# Altium PCB PY32E407Vx_START_ETH.PcbDoc (part 4 of 4)
Units mil, origin at the board's own origin, x right, y up, seen from the top; angles counter-clockwise.
Board outline 5249.65 x 2929.38 mil, 4 copper layers (Top Layer, GND, POWER, Bottom Layer); 253 components, 243 nets, 969 pads, 637 vias.
Unrouted connection lines stored in the file: 88.
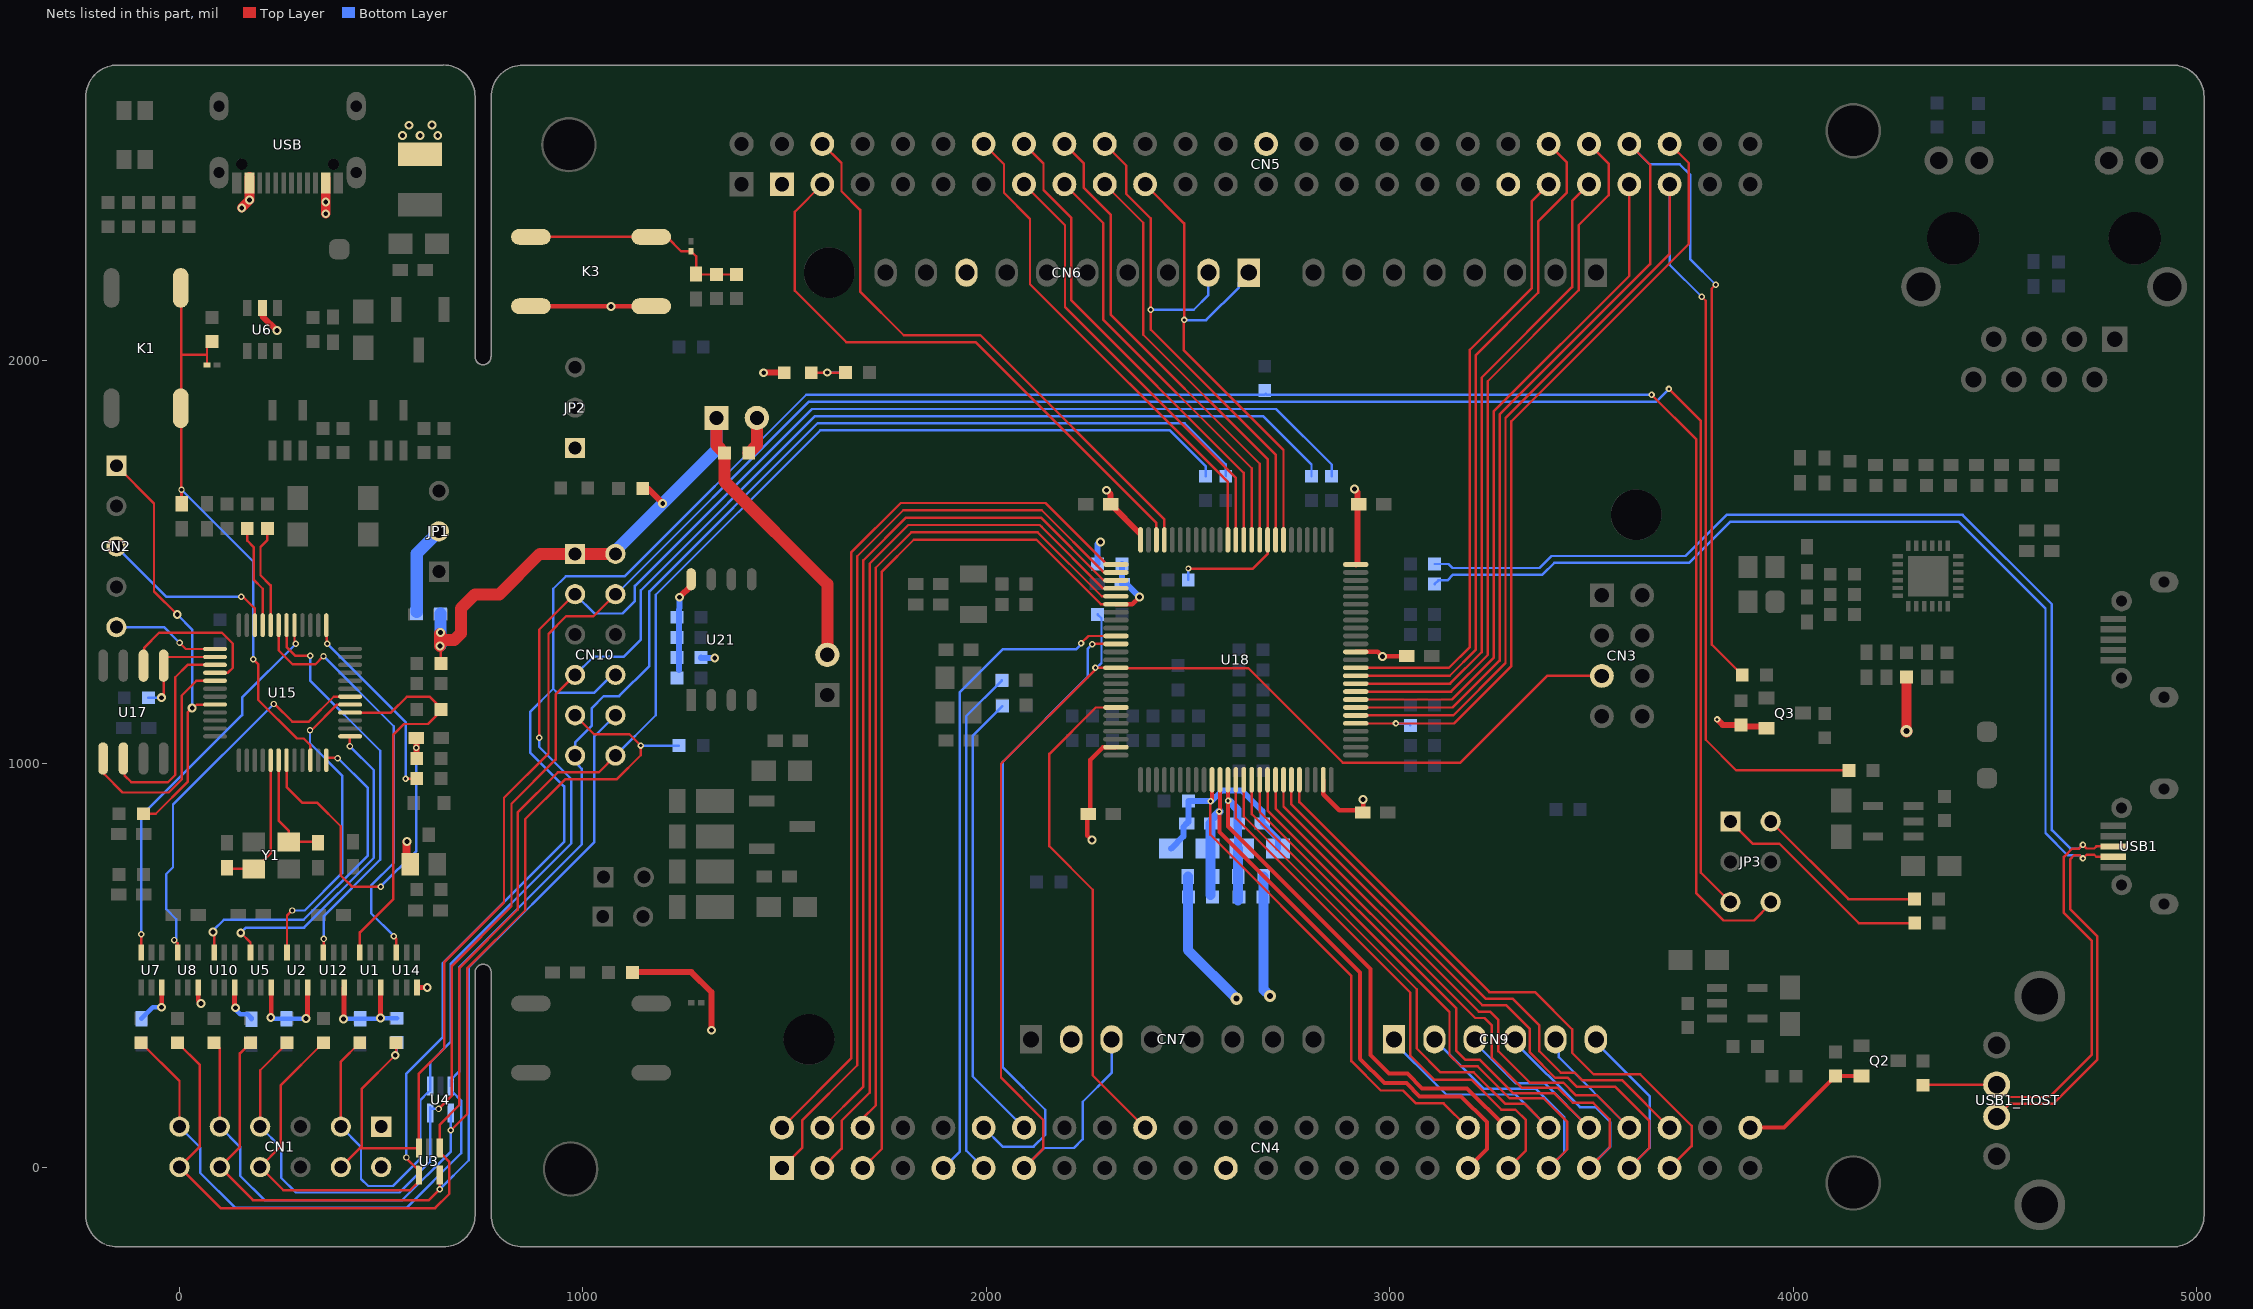
[diagram p5: the nets of this part, all layers, seen from the top]

## Via types
v1: diameter 22, hole 12, Top Layer to Bottom Layer, tented both sides, 393 vias
v2: diameter 16, hole 8, Top Layer to Bottom Layer, tented both sides, 115 vias
v3: diameter 20, hole 10, Top Layer to Bottom Layer, tented both sides, 54 vias
v4: diameter 16, hole 9, Top Layer to Bottom Layer, tented both sides, 41 vias
v5: diameter 30, hole 15, Top Layer to Bottom Layer, tented both sides, 16 vias
v6: diameter 20, hole 10, Top Layer to Bottom Layer, 9 vias
v7: diameter 15, hole 8, Top Layer to Bottom Layer, tented both sides, 5 vias
v8: diameter 16, hole 8, Top Layer to Bottom Layer, 3 vias
v9: diameter 20, hole 12, Top Layer to Bottom Layer, tented both sides, 1 vias

## Nets (pads, with @x,y where several pads share a name; then routed paths per layer and width w, separated by ;. In a path a pad name is that pad's centre, name@x,y a point inside that pad or via, vN(x,y) a via of type N, cw(c..) or ccw(c..) an arc to the next point about the centre after c; other vN are vias at no path point) (continued)
PD0: CN5.19 CN6.1 U18.82 | length 1240.6
  Top Layer w6: CN5.19@2393.11,2435.55 2489.9,2338.75 v2(2489.9,2099.31) 2488.41,2097.83 2488.41,2024.68 2736.11,1776.98 U18.82@2736.11,1554.33
  Bottom Layer w6: v2(2489.9,2099.31) 2490.31,2098.9 2544.4,2098.9 2625.61,2180.1 2625.61,2192.05 CN6.1@2650.11,2216.55
PD1: CN5.18 CN6.2 U18.83 | length 1370.1
  Top Layer w6: CN5.18@2293.11,2535.55 2346.5,2482.15 2346.5,2411.59 2407.16,2350.93 v2(2407.16,2124.56) 2407.1,2124.5 2407.1,2075.3 2716.43,1765.97 U18.83@2716.43,1554.33
  Bottom Layer w6: v2(2407.16,2124.56) 2513.57,2124.56 2550.11,2161.1 CN6.2@2550.11,2216.55
PD2: CN5.17 R50.2 U18.84 | length 1323.1
  Top Layer w6: CN5.17@2293.11,2435.55 2388.5,2340.15 2388.5,2062.59 2696.74,1754.35 2696.74,1519.51 2660.39,1483.16 v7(2500.17,1483.16)
  Bottom Layer w6: R50.2@2500,1455 2500.17,1455.17 v7(2500.17,1483.16)
PD3: CN5.16 U18.85 | length 1181.7
  Top Layer w6: CN5.16@2193.11,2535.55 2241.4,2487.25 2241.4,2426.49 2308.2,2359.69 2308.2,2111.89 2677.06,1743.03 U18.85@2677.06,1554.33
PD4: CN5.15 U18.86 | length 1073.5
  Top Layer w6: CN5.15@2193.11,2435.55 2289.6,2339.05 2289.6,2099.49 2657.37,1731.72 U18.86@2657.37,1554.33
PD5: CN5.14 U18.87 | length 1206.8
  Top Layer w6: CN5.14@2093.11,2535.55 2141.3,2487.35 2141.3,2421.59 2210.5,2352.39 2210.5,2147.59 2637.69,1720.4 U18.87@2637.69,1554.33
PD6: CN5.13 U18.88 | length 1098.6
  Top Layer w6: CN5.13@2093.11,2435.55 2194.5,2334.15 2194.5,2131.59 2618,1708.09 U18.88@2618,1554.33
PD7: CN5.12 U18.89 | length 1232.7
  Top Layer w6: CN5.12@1993.11,2535.55 2043.37,2485.28 2043.37,2414.47 2107.9,2349.94 2107.9,2187.81 2598.32,1697.39 U18.89@2598.32,1554.33 U18.89@2597.74,1553.76
PD8: CN5.46 R58.2 U18.55 | length 1977.9
  Top Layer w6: U18.55@2915.24,1099.61 2915.58,1099.28 3014.72,1099.28 v2(3014.83,1099.38) 3014.93,1099.28 3158.28,1099.28 3301,1241.99 3301,1848.33 3740.4,2287.73 3740.4,2488.25 CN5.46@3693.11,2535.55
  Bottom Layer w6: v2(3014.83,1099.38) 3015.62,1098.59 3046.5,1098.59 R58.2@3050.5,1094.59
PD9: CN5.45 R91.1 U18.56 | length 3580
  Top Layer w6: U18.56@2915.24,1119.29 3156.8,1119.29 3286.29,1248.78 3286.29,1856.09 3693.11,2262.91 CN5.45@3693.11,2435.55 ; v2(3772.51,2156.77) 3782.48,2146.8 3782.48,1058.89 3858.24,983.13 R91.1@4137.5,983.13
  Bottom Layer w6: CN5.45@3693.11,2435.55 3693.11,2236.17 v2(3772.51,2156.77)
PD10: CN5.44 R117.2 U18.57 | length 3344.7
  Top Layer w6: U18.57@2915.24,1138.98 3155.29,1138.98 3271.57,1255.27 3271.57,1864.73 3644.7,2237.86 3644.7,2483.95 CN5.44@3593.11,2535.55 ; v2(3807.19,2186.76) 3797.42,2176.99 3797.42,1294.82 R117.2@3872.98,1219.26
  Bottom Layer w6: CN5.44@3593.11,2535.55 3643.66,2484.99 3718.26,2484.99 3744.56,2458.69 3744.56,2249.39 v2(3807.19,2186.76)
PD11: CN5.43 U18.58 | length 1721.6
  Top Layer w6: U18.58@2915.24,1158.66 3153.67,1158.66 3256.86,1261.85 3256.86,1872.32 3593.11,2208.57 CN5.43@3593.11,2435.55
  Bottom Layer w6: CN5.43@3593.11,2435.55 3601.15,2435.55 CN5.43@3601.15,2419.35
PD12: CN5.42 U18.59 | length 1775.2
  Top Layer w6: U18.59@2915.24,1178.35 3151.56,1178.35 3242.14,1268.94 3242.14,1947.44 3467.9,2173.19 3467.9,2334.67 3541.7,2408.47 3541.7,2486.95 CN5.42@3493.11,2535.55
PD13: CN5.41 U18.60 | length 1613.9
  Top Layer w6: U18.60@2915.24,1198.03 3149.14,1198.03 3227.43,1276.32 3227.43,1956.62 3451.5,2180.69 3451.5,2393.94 CN5.41@3493.11,2435.55
PD14: CN5.40 U18.61 | length 1689.1
  Top Layer w6: U18.61@2915.24,1217.72 3147.93,1217.72 3212.71,1282.51 3212.71,2012.16 ; 3212.77,2012.16 3367.22,2166.62 3367.22,2343.8 3437.8,2414.37 3437.8,2490.85 CN5.40@3393.11,2535.55
PD15: CN5.39 U18.62 | length 1531.4
  Top Layer w6: U18.62@2915.24,1237.4 3146.31,1237.4 3198,1289.09 3198,2025.49 3351.5,2178.99 3351.5,2393.94 CN5.39@3393.11,2435.55
PE0: CN5.4 U18.97 | length 1443.5
  Top Layer w6: CN5.4@1593.11,2535.55 1640.59,2488.07 1640.59,2418.41 1686.8,2372.2 1686.8,2169.49 1794.99,2061.3 1984.79,2061.3 2440.83,1605.26 U18.97@2440.83,1554.33
PE1: CN5.3 U18.98 | length 1468.2
  Top Layer w6: CN5.3@1593.11,2435.55 1525,2367.44 1525,2171.89 1652.6,2044.29 1972.8,2044.29 2421.15,1595.94 U18.98@2421.15,1554.33
PE2: CN4.2 U18.1 | length 2266.5
  Top Layer w6: CN4.2@1493.11,97.55 1664.52,268.96 1664.52,1522.61 1787.68,1645.77 2146.58,1645.77 2299.04,1493.31 U18.1@2320.76,1493.31
PE3: CN4.1 U18.2 | length 2345.4
  Top Layer w6: CN4.1@1493.11,-2.45 1543,47.44 1543,115.59 1679.79,252.38 1679.79,1513.68 1793.68,1627.58 2136.94,1627.58 2290.88,1473.63 U18.2@2320.76,1473.63
PE4: CN4.4 U18.3 | length 2182.4
  Top Layer w6: CN4.4@1593.11,97.55 1695.05,199.49 1695.05,1503.98 1800.45,1609.38 2135,1609.38 2290.44,1453.94 U18.3@2320.76,1453.94
PE5: CN4.3 U18.4 | length 2261.5
  Top Layer w6: CN4.3@1593.11,-2.45 1641.1,45.54 1641.1,114.85 1710.32,184.07 1710.32,1495.3 1806.2,1591.18 2132.13,1591.18 2136.59,1586.72 2289.05,1434.26 U18.4@2320.76,1434.26
PE6: CN4.6 U18.5 | length 2098.2
  Top Layer w6: CN4.6@1693.11,97.55 1693.11,120.4 1725.59,152.88 1725.59,1485.09 1813.49,1572.99 2127.1,1572.99 2285.52,1414.57 U18.5@2320.76,1414.57
PE7: CN4.37 U18.38 | length 1352.4
  Top Layer w6: U18.38@2618,959.85 2618,914.55 2618,864.29 3050.5,431.79 3050.5,275.86 3109.75,216.61 3201.69,216.61 3276.2,142.09 3311,142.09 3336.8,116.29 3336.8,41.24 CN4.37@3293.11,-2.45
PE8: CN4.40 CN9.1 U18.39 | length 1729.7
  Top Layer w6: U18.39@2637.69,959.85 2637.69,869.22 3066.2,440.71 3066.2,294.09 3125.58,234.71 3207.48,234.71 3285.1,157.09 3333.56,157.09 CN4.40@3393.11,97.55
  Bottom Layer w6: CN9.1@3010.11,316.55 3010.11,309.05 3116.3,202.85 3139.26,179.89 3310.76,179.89 CN4.40@3393.11,97.55
PE9: CN4.39 CN9.2 U18.40 | length 1923.1
  Top Layer w6: U18.40@2657.37,959.85 2657.37,874.64 3147.4,384.61 3147.4,277.79 3175.21,249.99 3217.21,249.99 3296.6,170.59 3380.6,170.59 3439.6,111.59 3439.6,44.04 CN4.39@3393.11,-2.45
  Bottom Layer w6: CN9.2@3110.11,316.55 3232.16,194.49 3360.3,194.49 3432.3,122.49 3432.3,36.74 CN4.39@3393.11,-2.45
PE10: CN4.42 CN9.3 U18.41 | length 1659.5
  Top Layer w6: U18.41@2677.06,959.85 2677.06,880.24 3164.41,392.89 3164.41,287.77 3186.78,265.4 3222.99,265.4 3305.8,182.59 3408.06,182.59 CN4.42@3493.11,97.55
  Bottom Layer w6: CN9.3@3210.11,316.55 3210.11,309.05 3311.06,208.09 3382.56,208.09 CN4.42@3493.11,97.55
PE11: CN4.41 CN9.4 U18.42 | length 1891.2
  Top Layer w6: U18.42@2696.74,959.85 2696.74,883.79 3211.23,369.3 3234.4,369.3 3252.45,351.24 3252.45,270.94 3327.2,196.19 3416.2,196.19 3453.1,159.29 3503.5,159.29 3544.56,118.24 3544.56,49 CN4.41@3493.11,-2.45
  Bottom Layer w6: CN9.4@3310.11,316.55 3310.11,309.05 3470.76,148.39 3509,148.39 3546.2,111.19 3546.2,50.64 CN4.41@3493.11,-2.45
PE12: CN4.44 CN9.5 U18.43 | length 1615.7
  Top Layer w6: U18.43@2716.43,959.85 2716.43,888.76 3219.84,385.36 3247.64,385.36 3268.51,364.48 3268.51,286.98 3346.7,208.79 3429.7,208.79 3460.1,178.39 3512.26,178.39 CN4.44@3593.11,97.55
  Bottom Layer w6: CN9.5@3410.11,316.55 3418.11,308.55 3418.11,272.55 CN4.44@3593.11,97.55
PE13: CN4.43 CN9.6 U18.44 | length 1861.8
  Top Layer w6: U18.44@2736.11,959.85 2736.11,893.98 3228.68,401.42 3287.68,401.42 3346.7,342.39 3346.7,283.79 3409.6,220.89 3441.1,220.89 3463.3,198.69 3558.6,198.69 3642.1,115.19 3642.1,46.54 CN4.43@3593.11,-2.45
  Bottom Layer w6: CN9.6@3510.11,316.55 3510.11,309.05 3643.4,175.75 3643.4,47.84 CN4.43@3593.11,-2.45
PE14: CN4.46 U18.45 | length 1367.6
  Top Layer w6: U18.45@2755.8,959.85 2755.8,898.79 3237.12,417.48 3303.72,417.48 3370.4,350.79 3370.4,286.99 3423.7,233.69 3458.2,233.69 3477.1,214.79 3575.86,214.79 CN4.46@3693.11,97.55
PE15: CN4.45 U18.46 | length 1521.2
  Top Layer w6: U18.46@2775.48,959.85 2775.48,904.31 3246.26,433.54 3359.46,433.54 3451.8,341.19 3451.8,282.79 3504.7,229.89 3619.9,229.89 3747.4,102.39 3747.4,51.84 CN4.45@3693.11,-2.45
PF0: CN4.11 R40.1 | length 1262.9
  Bottom Layer w6: CN4.11@1993.11,-2.45 1949.92,40.73 1949.92,1117.72 R40.1@2038.2,1205.99
PF1: CN4.14 R41.1 | length 1127.9
  Bottom Layer w6: R41.1@2039.3,1142.19 1965.68,1068.57 1965.68,224.97 CN4.14@2093.11,97.55
PF2: CN4.20 U18.19 | length 1237.3
  Top Layer w6: U18.19@2320.76,1138.98 2270.85,1138.98 2155.8,1023.94 2155.8,794.99 2263.5,687.29 2263.5,227.15 CN4.20@2393.11,97.55
PF3: CN4.9 U18.10 | length 1642.7
  Top Layer w6: v2(2234.42,1298.19) 2252.38,1316.15 U18.10@2320.76,1316.15
  Bottom Layer w6: CN4.9@1893.11,-2.45 1934.17,38.61 1934.17,1177.16 2040.61,1283.59 2195.53,1283.59 2223.07,1283.59 2232.84,1293.36 2234.42,1294.94 v2(2234.42,1298.19)
PF4: CN4.12 U18.11 | length 1594
  Top Layer w6: v2(2262.22,1295.61) 2263.08,1296.46 U18.11@2320.76,1296.46
  Bottom Layer w6: CN4.12@1993.11,97.55 2039.86,50.79 2116.9,50.79 2145.6,79.49 2145.6,141.99 2040.7,246.89 2040.7,1004.35 2250.45,1214.1 2250.45,1283.84 v2(2262.22,1295.61)
PF5: CN3.5 CN4.13 CN7.3 R54.2 U18.14 | length 3438.5
  Top Layer w6: CN4.13@2093.11,-2.45 2140.2,44.64 2140.2,117.39 2035.9,221.69 2035.9,999.39 2272.2,1235.69 v2@2270.63,1237.27 ; v2(2270.1,1237.27) v2@2270.63,1237.27 ; CN3.5@3525.12,1217.14 3389.25,1217.14 3174.5,1002.39 2882.92,1002.39 2648.72,1236.59 2321.57,1236.59 U18.14@2320.76,1237.4 2320.62,1237.27 v2@2270.63,1237.27
  Bottom Layer w6: CN4.13@2093.11,-2.45 2142.75,47.19 2216.7,47.19 2238.7,69.19 2238.7,161.89 2310.11,233.3 CN7.3@2310.11,316.55 ; v2(2270.1,1237.27) 2272.77,1237.27 2285,1249.49 2285,1360.09 R54.2@2275.5,1369.59
PYLK_BOOT0: CN2.1 R27.1 U15.44 | length 1068.3
  Top Layer w6: CN2.1@-156.37,1737.99 -63.1,1644.72 -63.1,1426.49 v1(-5.62,1369.01) ; R27.1@-89.5,875.5 -58.78,875.5 20.3,954.58 20.3,1126.56 31.44,1137.7 v1(31.44,1138.07) 34.86,1138.07 42.95,1146.16 U15.44@87.99,1146.16
  Bottom Layer w6: v1(-5.62,1369.01) 31.44,1331.95 v1(31.44,1138.07)
PYLK_KEY: C5.2 K1.2 R14.1 U11.1 U15.10 | length 1499.9
  Top Layer w6: K1.2@3.09,2178.71 4,2177.8 4,2013.39 ; v4(5,1678.59) 5.5,1678.09 C5.2@5.5,1644 ; C5.2@5.5,1643.81 C5.2@5.5,1644 ; U11.1@68.2,1988 68.2,2013.35 ; R14.1@68.2,2038.7 68.2,2013.35 ; v2(182.8,1258.49) 194.9,1246.39 194.9,1158.25 291.15,1062 307.84,1062 323.91,1045.92 323.91,1008.86 U15.10@324.4,1008.37 ; 4,2013.39 4,1645.5 C5.2@5.5,1644 ; 4,2013.39 4.04,2013.35 68.2,2013.35
  Bottom Layer w6: v4(5,1678.59) 182.8,1500.79 v2(182.8,1258.49) v2@181.4,1257.09
PYLK_NRST: C24.2 R35.1 U15.7 | length 904.2
  Top Layer w6: U15.7@265.34,1008.18 265.34,941.65 303.74,903.25 340.69,903.25 399.5,844.45 399.5,722.91 427.38,695.03 v4(498.55,695.03)
  Top Layer w15: C24.2@587,1063 587,1029.88 587,1014 R35.1@588,1013
  Bottom Layer w6: v4(498.55,695.03) 587,783.48 v4(587,1039.09)
PYLK_OSCIN: C18.2 U15.5 Y1.3 | length 324.3
  Top Layer w6: C18.2@118,741.6 120.46,739.14 Y1.3@183.99,739.14 ; Y1.3@207.55,736.66 Y1.3@207.55,736.73 ; Y1.3@207.55,758.83 225.97,777.25 U15.5@225.97,1008.37
PYLK_OSCOUT: C23.2 U15.6 Y1.1 | length 291.3
  Top Layer w6: U15.6@245.66,1008.18 245.66,858.97 270.61,834.02 Y1.1@270.61,806.07 346.86,806.07 C23.2@348.7,807.9
PYLK_SPI_CS: R34.1 U15.38 U17.1 | length 258.5
  Top Layer w6: v1(-44.96,1163.25) -39.3,1168.91 U17.1@-39.3,1242.5 -39.3,1256.69 -31.91,1264.08 U15.38@88.18,1264.08
  Bottom Layer w6: R34.1@-77,1163 -45.21,1163 v1(-44.96,1163.25)
PYLK_SPI_MISO: U15.40 U17.2 | length 400.1
  Top Layer w6: U17.2@-89.3,1242.5 -87.63,1244.17 -87.63,1286.77 -50.4,1324 105.36,1324 131.9,1297.46 131.9,1237.16 119.95,1225.21 88.68,1225.21 U15.40@88.18,1224.71
PYLK_SPI_MOSI: U15.41 U17.5 | length 569.9
  Top Layer w6: U17.5@-189.3,1012.5 -186.24,1009.44 -186.24,973.64 -140.8,928.2 -26.75,928.2 5.5,960.45 5.5,1168.55 41.98,1205.03 U15.41@88.18,1205.03
PYLK_SPI_SCK: U15.39 U17.6 | length 536.9
  Top Layer w6: U17.6@-139.3,1012.5 -136.24,1009.44 -136.24,970.64 -119.1,953.5 -28.79,953.5 -10.5,971.79 -10.5,1213.73 20.17,1244.4 U15.39@88.18,1244.4
SWD_SCK: CN2.5 U15.37 | length 267.6
  Top Layer w6: v4(0.11,1299.21) 15.36,1283.96 87.99,1283.96 U15.37@88.18,1283.77
  Bottom Layer w6: CN2.5@-157,1338 -38.68,1338 v4(0.11,1299.21)
SWD_SDA: CN2.3 U15.34 | length 448.8
  Top Layer w6: v4(153,1413) 158,1413 186.6,1384.4 U15.34@186.6,1342.82
  Bottom Layer w6: CN2.3@-157,1538 -32,1413 v4(153,1413)
T_RESET: CN1.9 CN10.9 R17.2 R72.1 U4.4 | length 2545.1
  Top Layer w6: R17.2@85.57,308 100,293.57 CN1.9@100,115.48 ; v4(672.5,91.1) 713.57,132.18 713.57,493.07 857.03,636.52 857.03,862.42 955.4,960.79 1083.3,960.79 1143,1020.49 v2(1143,1044.59) 1115.1,1072.49 1027.6,1072.49 CN10.9@980.5,1119.59
  Bottom Layer w6: CN1.9@100,100 150.2,49.8 150.2,-21.5 210.64,-81.94 552.24,-81.94 672.5,38.32 v4(672.5,91.1) v4(672.5,91.1) 672.54,133.49 U4.4@672.59,133.54 ; v2(1143,1044.59) R72.1@1238,1044.59
T_RESETa: U10.3 U15.12 | length 823
  Top Layer w6: v1(83.4,582.2) 85.72,579.88 U10.3@85.72,531.35 ; U15.12@363.77,1008.37 363.77,1012.53 365.91,1014.67 390.24,1014.67 v4(391.72,1013.18)
  Bottom Layer w6: v1(83.4,582.2) 83.4,586.5 109.9,613 307.69,613 467,772.31 467,939.09 392.91,1013.18 v4(391.72,1013.18)
T_RTCK_DTRa: U5.3 U15.13 | length 791.5
  Top Layer w6: v1(151.7,580.5) 176.07,556.13 U5.3@176.07,531.35 ; v4(422.48,1042.59) 422.48,1066.89 U15.13@422.82,1067.23
  Bottom Layer w6: v1(151.7,580.5) 164.59,593.39 308.7,593.39 481.36,766.05 481.36,983.71 v4(422.48,1042.59)
T_RTCK_VCP_DTR: CN1.10 CN10.10 R9.2 U3.5 | length 2323.6
  Top Layer w6: R9.2@175.86,308 149.7,281.84 149.7,49.7 CN1.10@100,0 181.9,-81.9 618.1,-81.9 v4(644.59,-55.41) 644.59,-27.21 640.72,-23.34 U3.5@644.59,-19.46
  Bottom Layer w6: v4(644.59,-55.41) 717,17 717,493.79 1028.4,805.19 1028.4,1067.49 CN10.10@1080.5,1119.59
T_TCK_SWCLK: CN1.7 CN10.7 R6.2 R71.1 U4.5 | length 4394.2
  Top Layer w6: CN1.7@200,115.48 200,240 R6.2@268,308 ; v4(642,144) 675,177 675,498.69 822.8,646.49 822.8,900.19 932.3,1009.69 932.3,1171.39 CN10.7@980.5,1219.59
  Bottom Layer w6: CN1.7@200,100 251.8,48.2 251.8,-26.4 288.4,-63 545,-63 621.41,13.41 U4.5@621.41,144 ; U4.5@621.41,147.87 625.28,144 v4(642,144) ; CN10.7@980.5,1219.59 1025.3,1264.39 1100.3,1264.39 1143.6,1307.69 1143.6,1429.51 1575.09,1860.99 2685.57,1860.99 2805.5,1741.07 R71.1@2805.5,1712.09
T_TCK_SWCLKa: U2.3 U15.17 | length 785
  Top Layer w6: U2.3@266.41,531.35 266.41,623 v4(279.2,635.79) ; v4(323.42,1082.68) 327.03,1082.68 390.32,1145.97 U15.17@422.82,1145.97
  Bottom Layer w6: v4(279.2,635.79) 310.46,635.79 403.2,728.53 403.2,970.4 323.42,1050.19 v4(323.42,1082.68)
T_TDI_VCP_TX: CN1.8 CN10.8 JP3.6 R21.2 R75.1 U3.4 | length 7096.5
  Top Layer w6: R21.2@356.43,308 250.5,202.07 250.5,50.5 CN1.8@200,0 257.22,-57.22 571.78,-57.22 U3.4@592,-37 ; v4(562.51,23.64) 562.51,21.53 589.54,-5.49 U3.4@593.41,-19.46 ; v2(3648.3,1914.08) 3758.48,1803.9 3758.48,679.26 3826.79,610.95 3901.79,610.95 3943.61,652.77 JP3.6@3943.61,656.41
  Bottom Layer w6: v4(562.51,23.64) 562.51,231.51 652,321 652,504.79 953.1,805.89 953.1,943.29 868.9,1027.49 868.9,1127.79 926.45,1185.34 ; CN10.8@1080.5,1219.59 1072.3,1219.59 1027.7,1174.99 936.8,1174.99 926.45,1185.34 ; v2(3648.3,1914.08) 2694.71,1914.08 2692.2,1916.59 2689.6,1913.99 1553.29,1913.99 1103.19,1463.89 957.15,1463.89 926.45,1433.19 926.45,1185.34
T_TDI_VCP_TXa: U12.3 U15.30 | length 987.8
  Top Layer w6: U15.30@265.34,1342.82 265.34,1288.53 286.53,1267.35 v4(323.75,1267.35) ; U12.3@356.75,531.35 357.25,531.85 357.25,564.8 v4(357.76,565.31)
  Bottom Layer w6: v4(323.75,1267.35) 323.75,1205.64 497.61,1031.79 497.61,761.86 357.76,622.01 v4(357.76,565.31)
T_TDO_SWO: CN1.11 CN10.11 R12.2 R73.1 U4.3 | length 4409.4
  Top Layer w6: R12.2@-95,308 0,213 CN1.11@0,115.48
  Bottom Layer w6: CN1.11@0,100 51.6,48.4 51.6,-14.4 138.51,-101.31 562.33,-101.31 698,34.36 698,165.02 U4.3@677.67,185.36 ; U4.3@672.59,200.46 U4.3@672.59,207.72 ; U4.3@676.46,211.6 U4.3@672.59,207.72 ; R73.1@2593,1712.09 2593,1741.24 2490.91,1843.33 1581.41,1843.33 1164.6,1426.52 1164.6,1242.09 1089.49,1166.99 1051.57,1166.99 1022.2,1137.61 1022.2,1094.19 980.5,1052.49 980.5,1019.08 988.92,1010.66 988.92,994.86 997.1,986.68 997.1,799.39 693,495.29 693,236.62 672.59,216.21 U4.3@672.59,207.72
T_TDO_SWOa: U7.3 U15.29 | length 971.7
  Top Layer w6: v4(-95,577) v4(-95,577) U7.3@-94.96,531.35 ; U15.29@285.03,1342.82 285.03,1302.87 288.4,1299.5 v4(288.4,1296.79)
  Bottom Layer w6: v4(-95,577) -95,869.78 155.3,1120.08 155.3,1163.69 v4(288.4,1296.79)
T_TMS_SWDIO: CN1.3 CN10.3 R2.2 R70.1 U4.1 | length 4375.5
  Top Layer w6: CN1.3@400,115.48 400,261.29 R2.2@446.71,308 ; v2(891.6,1064.09) 891.6,1332.27 978.93,1419.59 CN10.3@980.5,1419.59
  Bottom Layer w6: CN1.3@400,100 449.91,50.09 449.91,-29.23 467.68,-47 529,-47 596.97,20.97 596.97,166.16 U4.1@616.12,185.31 ; U4.1@621.41,189.15 U4.1@621.41,200.46 621.41,259.41 672,310 672,503.09 971.4,802.49 971.4,961.19 891.6,1040.99 v2(891.6,1064.09) ; CN10.3@980.5,1419.59 1028.3,1371.79 1097.8,1371.79 1128.8,1402.79 1128.8,1440.27 1567.19,1878.66 2717.89,1878.66 2855.5,1741.05 R70.1@2855.5,1712.09
T_TMS_SWDIOa: R31.1 U1.3 U15.16 | length 980.6
  Top Layer w6: U15.16@422.82,1126.29 524.2,1126.29 563.09,1165.18 620.91,1165.18 652,1134.09 616,1098.09 556.5,1098.09 530,1071.59 530,664.63 447.09,581.73 U1.3@447.09,531.35
T_TRST_RTSa: U8.3 U15.18 | length 975.4
  Top Layer w6: v4(-12.67,562.56) -4.31,554.21 -4.31,531.66 U8.3@-4.62,531.35 ; v4(233.47,1147.57) 235.74,1147.57 279.35,1103.96 320.66,1103.96 382.36,1165.66 U15.18@422.82,1165.66
  Bottom Layer w6: v4(-12.67,562.56) -8,567.23 -8,614.19 -32.91,639.09 -32.91,726.19 -16,743.09 -16,898.1 v4(233.47,1147.57)
T_TRST_VCP_RTS: CN1.12 CN10.12 R13.2 R76.1 U3.1 | length 4444
  Top Layer w6: R13.2@-4.71,308 50.7,252.59 50.7,50.7 CN1.12@0,0 101.62,-101.62 633.38,-101.62 669,-66 669,12.96 U3.1@651.29,30.67 ; U3.1@644.59,33.91 644.59,104.59 693,153 693,492.49 838,637.49 838,878.39 937.6,977.99 1038.9,977.99 CN10.12@1080.5,1019.59 ; U3.1@646.07,30.24 U3.1@648.46,27.84
  Bottom Layer w6: CN10.12@1080.5,1019.59 1180.5,1119.59 1180.5,1418.18 1587.98,1825.66 2454.83,1825.66 2543,1737.49 R76.1@2543,1712.09
T_VCP_RX: CN1.4 CN10.4 JP3.5 R22.1 R24.2 U3.3 | length 6315.1
  Top Layer w6: CN1.4@400,0 447,47 ; R24.2@537,308 537,279.26 v1(534.69,276.95) 451.4,193.66 451.4,51.4 447,47 ; CN10.4@1080.5,1419.59 1026.1,1365.19 958.3,1365.19 914.5,1321.39 914.5,1025.29 804.3,915.09 804.3,655.69 656.38,507.77 656.38,294.38 593.41,231.41 U3.3@593.41,47.46 592.94,47 447,47 ; v2(3691.22,1928.53) 3770.48,1849.27 3770.48,729.54 JP3.5@3843.61,656.41
  Bottom Layer w6: v1(534.69,276.95) 538.7,280.96 R22.1@538.7,308.7 ; CN10.4@1080.5,1419.59 1082.57,1419.59 1559.3,1896.33 3659.02,1896.33 v2(3691.22,1928.53)
T_VCP_RXa: U14.3 U15.31 | length 1052.3
  Top Layer w6: U15.31@245.66,1342.82 245.66,1280.89 280.65,1245.9 336.54,1245.9 v4(356.96,1266.33) ; v4(530.59,571.9) 537.44,565.05 U14.3@537.44,531.35
  Bottom Layer w6: v4(356.96,1266.33) 531.02,1092.27 531.02,753.72 475,697.7 475,629.04 530.59,573.45 v4(530.59,571.9)
TVDD: C11.2 C12.2 C13.2 C14.2 CN1.1 CN1.2 CN10.1 CN10.2 JP4.2 JP5.1 R15.2 R16.2 R22.2 R33.2 R110.1 R112.2 U1.6 U2.6 U5.6 U7.6 U8.6 U10.6 U12.6 U14.6 | length 2811.8
  Top Layer w6: R16.2@648,1238 v1@648,1288.5
  Top Layer w12: v1@-43.78,396.48 U7.6@-43.78,444.73 ; U8.6@46.56,444.73 46.56,412.54 53.66,405.44 v1(53.66,405.36) ; U10.6@136.68,444.51 136.68,396.79 v1(138.76,394.71) ; v1(226.14,370.36) 227.25,371.46 U5.6@227.25,444.73 ; v1(313.66,368.22) 317.59,372.15 U2.6@317.59,444.73 ; v1(406.55,366.75) 407.93,368.13 U12.6@407.93,444.73 ; U1.6@498.28,444.73 498.28,369.22 v1(498.5,369) ; U14.6@588.62,444.73 588.89,445 v1(614,445) ; v1(645.4,1291.1) v1@648,1288.5 ; v1@645.4,1321 648,1323.6 v1(646.5,1325.1) ; R112.2@1148,1682.09 R112.2@1160.02,1682.09
  Top Layer w15: R112.2@1160.02,1682.09 v1(1197.52,1644.59)
  Top Layer w20: v1(563.45,806.47) 562.41,805.43 562.41,760.12 R15.2@572.04,750.5
  Top Layer w30: v1(645.4,1291.1) 645.4,1306.05 ; v1@645.4,1321 645.4,1306.05 ; CN10.2@1080.5,1519.59 CN10.1@980.5,1519.59 893,1519.59 792.5,1419.09 731.9,1419.09 697.53,1384.72 697.53,1322.64 680.93,1306.05 645.4,1306.05 ; JP5.1@1330.89,1856.71 1330.89,1789.21 R110.1@1350.89,1769.21 1350.89,1699.21 1605.5,1444.59 JP4.2@1605.5,1269.59
  Bottom Layer w12: C12.2@-94.3,367.9 -66.1,396.1 v1(-44.16,396.1) ; v1(138.76,394.71) 138.76,391.04 150.98,378.82 168.7,378.82 178.2,369.32 C13.2@178.2,366.3 ; v1(226.14,370.36) 228.8,367.7 C11.2@265.7,367.7 313.14,367.7 v1(313.66,368.22) ; v1(406.55,366.75) 407.5,367.7 C14.2@447.9,367.7 497.2,367.7 v1(498.5,369) 498.8,368.7 R22.2@538.7,368.7 ; v1(645.4,1291.1) 646.1,1291.1 647.1,1292.1 v1@646.5,1292.7 ; v1(646.5,1325.1) v1@647.1,1325.7 ; CN10.2@1080.5,1519.59 CN10.2@1080.5,1527.58
  Bottom Layer w30: v1@646.5,1292.7 v1(646.5,1325.1) ; v1@647.1,1325.7 R33.2@647.1,1371.3 ; CN10.2@1080.5,1527.58 v1(1197.52,1644.59) 1330.89,1777.97 JP5.1@1330.89,1856.71
TVDD*: JP1.2 R33.1 | length 222.8
  Bottom Layer w30: R33.1@588,1375.5 588,1520.5 JP1.2@643,1575.5
TVDD_DISCHARGE_EN: R18.2 U15.25 | length 489.6
  Top Layer w6: U15.25@363.77,1342.82 364.66,1341.93 364.66,1298.44 v2(366,1297.09) ; v2(560.31,962.53) 587.53,962.53 R18.2@588,963
  Bottom Layer w6: v2(366,1297.09) 560.31,1102.78 v2(560.31,962.53)
USB1_D+: R86.2 R115.1 USB1.3 USB1_HOST.3 | length 3476.1
  Top Layer w6: R115.1@4321.23,202.64 4322.28,203.69 USB1_HOST.3@4503.65,203.69 4533.75,173.59 4634.6,173.59 4738.81,277.81 4738.81,561.28 4670.2,629.89 4670.2,768.7 4690.7,789.19 4707.57,789.19 v2(4717.22,798.85) v2@4717.22,798.67 ; v2@4717.22,796.12 v2@4717.22,798.67 ; USB1.3@4792.65,794.59 4750.59,794.59 4745.48,789.48 4726.4,789.48 v2@4717.22,798.67
  Bottom Layer w6: R86.2@3110.5,1494.59 3145.38,1494.59 3155.3,1484.67 3370.48,1484.67 3400.1,1514.29 3732.1,1514.29 3833.9,1616.09 4419,1616.09 4640.4,1394.69 4640.4,835.09 4686.29,789.21 4707.58,789.21 v2(4717.22,798.85)
USB1_D-: R87.2 USB1.2 USB1_HOST.2 | length 3294.2
  Top Layer w6: USB1_HOST.2@4503.65,124.99 4535.05,156.39 4643,156.39 4753,266.39 4753,571.69 4686.4,638.29 4686.4,763.5 4695.59,772.69 4709.28,772.69 v2(4717.22,764.75) ; v2@4717.22,764.93 4726.4,774.11 4745.48,774.11 4750.59,769 USB1.2@4792.65,769
  Bottom Layer w6: R87.2@3110.5,1444.59 3119.86,1453.95 3142.45,1453.95 3156.59,1468.09 3378,1468.09 3407.25,1497.34 3741.25,1497.34 3842.7,1598.79 4410.2,1598.79 4624.52,1384.47 4624.52,827.47 4679.27,772.72 4709.26,772.72 v2(4717.22,764.75)
USB1_ID: JP3.2 R84.1 | length 435.5
  Top Layer w6: JP3.2@3943.61,856.41 4135.9,664.12 R84.1@4299.46,664.12
USB1_VBUS: JP3.1 R89.1 | length 561.2
  Top Layer w6: JP3.1@3843.61,856.41 3898.35,801.67 3964.83,801.67 4161.87,604.63 R89.1@4300.5,604.63
USB_DM: R10.2 U15.32 | length 257.7
  Top Layer w6: R10.2@218,1583 218,1554.08 200.79,1536.87 200.79,1466.58 225.97,1441.4 U15.32@225.97,1342.82
USB_DP: R11.2 U15.33 | length 256
  Top Layer w6: R11.2@168,1583 168,1552.45 183.78,1536.68 183.78,1455.75 206.29,1433.23 U15.33@206.29,1342.82
USER_KEY: C39.2 K3.1 R79.1 R82.2 U20.1 | length 574
  Top Layer w6: K3.1@871,2305.29 K3.1@1169,2305.29 1207.8,2305.29 1243.3,2269.79 U20.1@1268,2269.79 1280.5,2257.29 C39.2@1280.5,2213.09 1281.5,2212.09 R82.2@1330.5,2212.09 R79.1@1380.5,2212.09
USER_LED: LED2.2 R80.1 R81.1 | length 123.1
  Top Layer w6: LED2.2@1566,1968.59 1605.15,1968.59 v6(1605.32,1968.76) 1641.83,1968.76 1642,1968.59 R81.1@1643,1969.59
  Bottom Layer w6: v6(1605.32,1968.76) 1649.67,1968.76 R80.1@1650.5,1969.59
VBAT: C58.2 CN4.5 R111.2 U18.6 | length 2348.9
  Top Layer w6: CN4.5@1693.11,-2.45 1740.85,45.29 1740.85,1475.9 1819.75,1554.79 2123.62,1554.79 2283.51,1394.89 U18.6@2320.76,1394.89
  Top Layer w11: U18.6@2320.76,1394.89 2361.2,1394.89 v1(2379.1,1412.79)
  Bottom Layer w6: C58.2@2335.5,1445.59 C58.2@2336.5,1444.59 C58.2@2347.3,1444.59 ; v1@2377.19,1414.71 v1(2379.1,1412.79)
  Bottom Layer w15: C58.2@2335.5,1445.59 R111.2@2335.5,1494.59 ; C58.2@2347.3,1444.59 v1@2377.19,1414.71
VBUS_PYLK: FUSE1.1 U6.5 USB.A4 USB.A9 USB.B4 USB.B9 | length 245.4
  Top Layer w15: U6.5@205.5,2128.65 205.5,2108.9 240.94,2073.47 v1(241.93,2073.47)
  Top Layer w24: v1(154.2,2377.18) v1(173.54,2396.51) USB.B4@173.54,2454.3 ; v1(362.48,2362.54) v1(362.48,2391.55) USB.B9@362.48,2451.95
  other v1: 552.96,2556.2 596.52,2556.2 640.08,2556.2 568.71,2581.79 625.88,2582.12
VCCA: C35.2 C36.2 CN4.38 L1.2 R74.2 U18.37 | length 1502.5
  Top Layer w10: U18.37@2598.32,959.85 2598.32,911.82 2601.97,908.17 2601.97,907.06 2599.1,904.19 2599.1,844.1 2951.9,491.3 2951.9,277.43 2998.04,231.3 3043.45,231.3 3079.52,195.23 3191.29,195.23 3288.97,97.55 CN4.38@3293.11,97.55
  Bottom Layer w20: v2@2600.7,905.79 2602.72,905.79 2622.49,886.03 C36.2@2622.49,845.61 ; C35.2@2623.5,789.09 C36.2@2623.5,845.61
  Bottom Layer w25: R74.2@2623.5,660.49 2623.5,719.59 C35.2@2623.5,789.09
  other v2: 2598.78,907.56
VDD: C30.2 C31.2 C32.2 C33.2 C34.2 CN4.23 CN4.50 CN5.1 CN5.26 CN5.37 CN7.2 JP2.1 JP5.2 K3.2 L1.1 L2.1 LED2.1 Q2.2 Q3.2 R57.1 R74.1 R77.1 R88.1 R97.1 R110.2 R111.1 R113.1 R116.1 U18.24 U18.49 U18.64 U18.75 U18.100 | length 3032.7
  Top Layer w6: U18.75@2890.24,1493.21 2894.92,1493.21 U18.75@2897.6,1495.9
  Top Layer w10: CN4.50@3893.11,97.55 3976.07,97.55 4104.22,225.7 Q2.2@4169,225.7 ; Q2.2@4167.07,228.87 Q2.2@4167.71,228.23
  Top Layer w11: K3.2@846,2133.49 846.4,2133.09 1143.6,2133.09 K3.2@1144,2133.49 ; C32.2@2250.2,875.01 2250.2,821.31 v1(2261.34,810.17) ; C32.2@2252.54,875.01 2256.98,879.45 2256.98,1008.87 2288.66,1040.55 U18.24@2320.76,1040.55 ; U18.49@2834.54,959.85 2834.54,923.95 2874.1,884.39 2932.61,884.39 2933.41,885.19 v1(2933.41,911) ; U18.64@2915.24,1276.77 2969.87,1276.77 v1(2981.6,1265.04) 2982.86,1266.29 C30.2@3041.8,1266.29
  Top Layer w15: R57.1@1123,482.09 1123.99,483.08 1268.63,483.08 1318.54,433.17 v1(1318.54,339.07) ; v1(1447.8,1968.59) LED2.1@1499,1968.59 ; v1(2297.33,1677.44) 2307.7,1667.07 C34.2@2307.7,1642.49 U18.100@2379.99,1570.21 ; v1(2911.66,1680.25) 2919.6,1672.31 2919.6,1497.67 U18.75@2915.24,1493.31 ; v2@3810.71,1109.47 3824.51,1095.67 R116.1@3869.41,1095.67 3873.42,1091.66 3928.86,1091.66 Q3.2@3932.87,1087.65
  Top Layer w25: v5(4280.5,1080.69) R97.1@4280.5,1214.59
  Top Layer w30: R110.2@1410.89,1769.21 1430.89,1789.21 JP5.2@1430.89,1856.71 ; v5@4279.7,1079.89 v5(4280.5,1080.69)
  Bottom Layer w15: R88.1@1292.5,1262.5 1292.92,1262.08 1326.18,1262.08 v1(1326.6,1261.67) ; R111.1@2275.5,1494.59 2275.5,1544.44 2280.18,1549.12 v1(2282.22,1549.12)
  Bottom Layer w25: L2.1@2499,719.59 2499,538.09 v5(2619.9,417.19) ; L1.1@2687,719.59 2687,439.51 v5(2702.4,424.1)
  other v1: 1069,2133.09
  other v2: 3810.55,1109.31
VDD_FLASH: R48.2 R49.2 R88.2 R90.2 U21.8 | length 238.1
  Top Layer w6: U21.8@1268,1441.14 U21.8@1268,1456.7
  Top Layer w15: v1(1238.93,1412.07) U21.8@1268,1441.14
  Bottom Layer w6: 1238,1382.09 1236.7,1383.39 1238.93,1385.62
  Bottom Layer w15: 1238,1232.09 1238,1282.09 1238,1332.09 1238,1382.09 ; 1238.93,1385.62 v1(1238.93,1412.07)
VREF+: C37.2 C38.2 CN4.35 CN6.8 L2.2 R77.2 U18.36 | length 1554.8
  Top Layer w6: CN4.35@3193.11,12.55 CN4.35@3193.11,14.55
  Top Layer w10: v2(2577.06,880.92) 2577.06,830.46 2925.46,482.06 2925.46,268.38 2985.9,207.94 3040.52,207.94 3073.09,175.37 3176.41,175.37 3240.52,111.26 3240.52,44.96 CN4.35@3193.11,-2.45 ; v2@2578.63,882.49 2578.63,933.77 U18.36@2578.63,959.85
  Bottom Layer w6: v2(2577.06,880.92) v2@2578.48,879.5
  Bottom Layer w20: C38.2@2558.6,862.46 v2(2577.06,880.92)
  Bottom Layer w25: R77.2@2555.5,674.59 2555.5,726.59 2555.5,789.09 C38.2@2555.5,851.59
VSSA: C35.1 C36.1 C37.1 C38.1 CN4.36 R78.1 U18.35 | length 1659.9
  Top Layer w6: v2(2555.42,906.8) 2554.42,905.8 2554.42,823.9 2904.42,473.9 2904.42,262.42 2977.15,189.69 3032.3,189.69 3064.28,157.71 3132.94,157.71 CN4.36@3193.11,97.55 ; v2@2557.26,906.8 v2@2558.94,908.48
  Top Layer w10: v2@2558.94,908.48 U18.35@2558.94,959.85
  Bottom Layer w15: C37.1@2457.6,789.09 2487.83,819.33 2487.83,842.83 C38.1@2496.6,851.59 2500.4,855.39 R78.1@2500.4,907.19 2500.79,906.8 v2(2555.42,906.8) ; v2@2556.87,907.19 2557.26,906.8 2583.7,933.24 2632.75,933.24 2683.6,882.39 C36.1@2683.6,851.59 2722.6,812.59 C35.1@2722.6,789.09
pads on no net: CN7.1 CN7.8 ETH. ETH.7 U15.42 U15.45 U22.10 USB. USB.A8 USB.B8

## Polygon pours and split planes (outlines as drawn)
GND on Bottom Layer "Top-GND" (solid, remove dead copper, pour order 1): -234.03,2678.13 -181.73,2730.43 4967.27,2730.43 5022.07,2675.63 5022.07,-152.47 4975.57,-198.97 -163.73,-198.97 -232.13,-130.57 -232.13,2676.43
GND on Top Layer "Top-GND" (solid, remove dead copper, pour order 0): -232.31,2677.83 -180.71,2729.43 4969.59,2729.43 5023.29,2675.73 5023.29,-154.57 4978.2,-199.67 -163.61,-199.67 -232.31,-130.97
3V3_PYLK on POWER (split plane): 161 vertices, not listed, extent -211.9,-177.9 745.42,2711
VDD on POWER (split plane): 162 vertices, not listed, extent 765.34,-177.9 4997.55,2710.89
TVDD on POWER (split plane): 655.91,1243.18 638,1243.18 635.39,1242.84 632.96,1241.83 630.87,1240.23 629.26,1238.14 628.26,1235.7 627.91,1233.09 627.91,557.09 627.91,-57.31 456.39,-57.31 456.39,284.1 456.04,286.71 455.03,289.14 453.43,291.23 451.34,292.84 448.91,293.84 446.3,294.19 -118.21,294.19 -118.21,460.31 483,460.31 485.61,460.66 488.04,461.67 490.13,463.27 491.73,465.36 492.74,467.79 493.09,470.4 493.09,1346.01 655.91,1346.01
3V3 on POWER (split plane): 1693.21,790.15 1001.91,790.15 999.3,789.8 996.87,788.8 994.78,787.19 993.17,785.1 992.17,782.67 991.82,780.06 991.82,624.42 991.82,548.24 992.17,545.63 993.17,543.2 994.78,541.11 996.87,539.51 999.3,538.5 1001.91,538.15 1344.91,538.15 1344.91,443.13 1345.26,440.52 1346.26,438.09 1347.87,436 1349.96,434.4 1352.39,433.39 1355,433.04 2441.51,433.04 2441.51,261.38 2322.59,261.38 2322.59,377.86 2322.24,380.47 2321.23,382.9 2319.63,384.99 2317.54,386.6 2315.11,387.6 2312.5,387.95 883.28,387.95 883.28,866.81 1495.2,866.81 1497.81,867.15 1500.24,868.16 1502.33,869.76 1503.93,871.85 1504.94,874.28 1505.29,876.89 1505.29,1217.81 1693.21,1217.81
VBUS_PYLK on POWER (split plane): 670.93,2709.03 681.6,2704.61 691.21,2698.19 699.38,2690.02 705.8,2680.42 710.22,2669.75 712.47,2658.42 712.47,2652.64 712.47,2048.89 127.09,2048.89 127.09,2711 653.83,2711 654.2,2711.03 654.57,2711.01 659.97,2711.21
5V_USB1_START on POWER (split plane): 4595.27,558.33 1365.09,558.33 1365.09,568.19 1364.74,570.81 1363.73,573.24 1362.13,575.33 1360.04,576.93 1357.61,577.94 1355,578.28 1352.39,577.94 1349.96,576.93 1347.87,575.33 1346.26,573.24 1345.26,570.81 1344.91,568.19 1344.91,558.33 1012,558.33 1012,624.42 1012,659.91 3215.5,659.91 3218.11,660.25 3218.49,660.41 4595.27,660.41
5V_USB2_START on POWER (split plane): 4596.3,680.58 3191,680.58 3188.39,680.24 3188.01,680.08 1012,680.08 1012,769.97 1693.21,769.97 1693.21,765.29 1693.56,762.68 1694.56,760.25 1696.17,758.16 1698.26,756.56 1700.69,755.55 1703.3,755.21 1705.91,755.55 1708.34,756.56 1710.43,758.16 1712.03,760.25 1713.04,762.68 1713.39,765.29 1713.39,769.97 3512.58,769.97 3512.86,767.88 3513.86,765.45 3515.47,763.36 3517.56,761.76 3519.99,760.75 3522.6,760.41 3525.21,760.75 3527.64,761.76 3529.73,763.36 3531.33,765.45 3532.34,767.88 3532.62,769.97 4497.7,769.97 4500.31,770.32 4502.74,771.33 4504.83,772.93 4506.43,775.02 4507.44,777.45 4507.79,780.06 4507.79,874.81 4596.3,874.81
5V on POWER (split plane): 3691.41,1006.19 3691.76,1003.58 3692.76,1001.15 3694.37,999.06 3696.46,997.46 3698.89,996.45 3701.5,996.11 4715.91,996.11 4715.91,454.52 2570.8,454.52 2568.19,454.17 2565.76,453.17 2563.67,451.56 2562.06,449.47 2561.06,447.04 2560.71,444.43 2560.71,277.24 2560.71,263.68 2461.69,263.68 2461.69,443.13 2461.34,445.74 2460.33,448.17 2458.73,450.26 2456.64,451.86 2454.21,452.87 2451.6,453.22 1365.09,453.22 1365.09,538.15 4605.36,538.15 4607.97,538.5 4610.4,539.51 4612.49,541.11 4614.09,543.2 4615.1,545.63 4615.45,548.24 4615.45,660.55 4615.1,663.16 4614.49,664.63 4615.12,665.45 4616.13,667.88 4616.48,670.49 4616.48,884.89 4616.13,887.51 4615.12,889.94 4613.52,892.03 4611.43,893.63 4609,894.64 4606.39,894.98 4495.6,894.98 4492.99,894.64 4490.56,893.63 4488.47,892.03 4486.86,889.94 4485.86,887.51 4485.51,884.89 4485.86,882.28 4486.86,879.85 4487.61,878.88 4487.61,790.15 3532.69,790.15 3532.69,1471.71 3691.41,1471.71
VREF+ on POWER (split plane): 1992.91,943.99 1993.26,941.38 1994.26,938.95 1995.87,936.86 1997.96,935.26 2000.39,934.25 2003,933.91 2642.31,933.91 2642.31,848.08 1907.89,848.08 1907.89,2269.61 1992.91,2269.61
ETH_VDD on POWER (split plane): 4881.11,1244.78 4396.49,1244.78 4396.49,1309.31 4782.5,1309.31 4785.11,1309.65 4787.54,1310.66 4789.63,1312.26 4791.23,1314.35 4792.24,1316.78 4792.59,1319.39 4792.59,1874.09 4792.24,1876.7 4791.23,1879.14 4789.63,1881.23 4787.54,1882.83 4785.11,1883.84 4782.5,1884.18 4545.69,1884.18 4545.69,2107.71 4881.11,2107.71
ETH_VDDA on POWER (split plane): 4955.81,2708.74 4966.48,2704.32 4976.09,2697.91 4984.26,2689.74 4990.68,2680.13 4995.1,2669.46 4997.35,2658.13 4997.35,2652.35 4997.39,2127.88 4902.7,2127.88 4900.09,2127.54 4897.66,2126.53 4896.95,2125.99 4896.24,2126.53 4893.81,2127.54 4891.2,2127.88 4535.6,2127.88 4532.99,2127.54 4530.56,2126.53 4528.47,2124.93 4526.86,2122.84 4525.86,2120.41 4525.51,2117.79 4525.51,1874.09 4525.86,1871.48 4526.86,1869.05 4528.47,1866.96 4530.56,1865.36 4532.99,1864.35 4535.6,1864.01 4772.41,1864.01 4772.41,1329.48 4386.4,1329.48 4383.79,1329.14 4381.36,1328.13 4379.27,1326.53 4377.66,1324.44 4376.66,1322.01 4376.31,1319.39 4376.31,1234.69 4376.66,1232.08 4377.66,1229.65 4379.27,1227.56 4381.36,1225.96 4383.79,1224.95 4386.4,1224.61 4492.81,1224.61 4492.81,1142.38 3835.49,1142.38 3835.49,2710.89 4938.71,2711 4944.48,2711
GND on GND (split plane): 185 vertices, not listed, extent -211.9,-177.9 4997.55,2711.21

## Keep-outs
Keep-Out Layer:
  lines w5: 653.83,2731.09 -153.26,2731.09 ccw(c-153.26,2652.35) -232,2652.35 -232,-119.26 ccw(c-153.26,-119.26) -153.26,-198 653.78,-198 ccw(c653.81,-119.23) 732.55,-119.23 ; 653.83,2731.38 cw(c653.83,2652.64) 732.57,2652.64 732.57,2008.08 ccw(c752.25,2008.08) 771.94,2008.08 ; 732.57,-118.95 732.57,483.05 ; 732.57,650.05 732.57,1357.05 ; 732.92,483.05 cw(c752.61,483.05) 772.29,483.05 772.29,-119.17 ; 732.92,650.05 ccw(c752.61,650.05) 772.29,650.05 ; 732.92,1356.05 cw(c752.61,1356.05) 772.29,1356.05 ; 771.94,650.05 771.94,1356.05 ; 772.21,2008.35 772.21,2651.95 cw(c850.95,2651.95) 850.95,2730.69 ; 772.35,-119.17 ccw(c851.09,-119.17) 851.09,-197.91 ; 850.95,2731.09 4938.71,2731.09 cw(c4938.71,2652.35) 5017.45,2652.35 ; 851.09,-198 4938.87,-198 ccw(c4938.87,-119.26) 5017.61,-119.26 ; 5017.65,-119.26 5017.65,2652.35 ; 732.57,1465.05 ccw(c752.25,1465.05) 771.94,1465.05 771.94,1911.05 ccw(c752.25,1911.05) 732.57,1911.05 732.57,1465.05

## Other copper
Top Layer:
  pour cut-out: 431,1616 503,1616 503,1608 431,1608
  pour cut-out: 233.5,1675.4 329.8,1675.4 329.8,1596.9 258,1596.9 258,1573 233.5,1573
  pour cut-out: 18.7,1675 57.2,1675 57.2,1589.83 18.7,1589.83
  pour cut-out: 1378.2,888.8 1475.9,888.8 1475.9,681.1 1369.3,681.1 1369.3,888.9 1378.2,888.9
  region net 3V3_PYLK: 480.5,1963.7 438.9,1922.1 375.2,1922.1 349.4,1947.9 349.4,1991.9 365.1,2007.6 365.1,2045 374.9,2054.8 456.6,2054.8 480.5,2030.9
  region net VBUS_PYLK: 651.3,2517.4 651.3,2572.6 631.1,2592.8 564.1,2592.8 541.7,2570.4 541.7,2520.8 554.4,2508.1 642,2508.1
Bottom Layer:
  pour cut-out: 2566.4,765.8 2566.4,654.1 2613.1,654.1 2613.1,764.5
POWER (plane layer: these items are gaps in the copper):
  lines w20: 117,2725.2 117,2038.8 743,2038.8 ; 750.6,1818.7 750.6,2718.09 ; 755.5,500.5 755.5,613 ; 755.5,1388 755.5,1425.5 ; 755.5,1950.5 755.5,1975.5 ; 1002.28,669.99 3215.5,669.99 ; 1355,568.19 1355,443.13 2451.6,443.13 2451.6,253.59 2570.8,253.59 2570.8,277.24 2570.8,444.43 3430.56,444.43 4726,444.43 4726,1006.19 3701.5,1006.19 3701.5,1481.79 3522.6,1481.79 3522.6,770.49 ; 1703.3,765.29 1703.3,1227.89 1495.2,1227.89 1495.2,876.89 873.19,876.89 873.19,377.86 2312.5,377.86 2312.5,252.69 2313.9,251.29 2451.6,251.29 ; 3191,670.49 4606.39,670.49 4606.39,884.89 4495.6,884.89 ; 4497.7,884.89 4497.7,780.06 3101.23,780.06 1001.91,780.06 1001.91,624.42 1001.91,548.24 3295.05,548.24 4605.36,548.24 4605.36,660.55 ; 4502.9,1234.29 4502.9,1132.29 3825.4,1132.29 3825.4,2724.09 4981,2724.09 5015.1,2689.99 5015.1,2117.79 4902.7,2117.79 ; -128.3,284.1 446.3,284.1 446.3,-67.4 638,-67.4 638,557.09 638,1233.09 666,1233.09 666,1356.09 483,1356.09 483,470.4 -128.3,470.4 -128.3,284.1 ; 1897.8,837.99 2652.4,837.99 2652.4,943.99 2003,943.99 2003,2279.69 1897.8,2279.69 1897.8,837.99 ; 4386.4,1234.69 4461.5,1234.69 4891.2,1234.69 4891.2,2117.79 4535.6,2117.79 4535.6,1874.09 4782.5,1874.09 4782.5,1319.39 4386.4,1319.39 4386.4,1234.69

## Silkscreen, mask and mechanical layers (free items; w line width, h text height)
Top Overlay:
  drawing of 1084 lines, arcs and shapes, not listed
  text "E0" at 1581.05,2596.18 h60 r45
  text "B8" at 1681.08,2596.15 h60 r45
  text "B6" at 1781.31,2596.16 h60 r45
  text "D5" at 2079.06,2596.14 h60 r45
  text "D3" at 2179.33,2596.16 h60 r45
  text "A10" at 2867.96,2596.16 h60 r45
  text "A8" at 2978.64,2596.13 h60 r45
  text "D10" at 3570.03,2596.17 h60 r45
  text "D8" at 3680.7,2596.15 h60 r45
  text "B4" at 1880.68,2595.69 h60 r45
  text "D7" at 1979.02,2595.68 h60 r45
  text "D1" at 2281.38,2595.68 h60 r45
  text "A14" at 2568.75,2595.69 h60 r45
  text "A12" at 2767.74,2595.69 h60 r45
  text "D14" at 3370.19,2595.71 h60 r45
  text "D12" at 3469.81,2595.7 h60 r45
  text "B14" at 3770.65,2595.71 h60 r45
  text "B12" at 3870.26,2595.71 h60 r45
  text "C8" at 3079.12,2589.03 h60 r45
  text "C6" at 3180.15,2589.07 h60 r45
  text "GND" at 1461.47,2588.39 h60 r45
  text "C12" at 2368.74,2588.65 h60 r45
  text "C10" at 2469.65,2588.56 h60 r45
  text "GND" at 3263.47,2588.39 h60 r45
  text "GND" at 1364.47,2587.39 h60 r45
  text "VDD" at 2661.62,2584.57 h60 r45
  text "51" at 3980.46,2508.08 h60 r45
  text "52" at 3984.08,2403.9 h60 r45
  text "E1" at 1584.86,2313.89 h60 r45
  text "B9" at 1682.42,2313.73 h60 r45
  text "B3" at 1982.45,2312.76 h60 r45
  text "D9" at 3683.45,2311.76 h60 r45
  text "D2" at 2279.84,2310.7 h60 r45
  text "D0" at 2380.53,2310.84 h60 r45
  text "A9" at 2981.98,2310.29 h60 r45
  text "C9" at 3082.12,2310.03 h60 r45
  text "D6" at 2081.48,2309.79 h60 r45
  text "B7" at 1781.77,2308.54 h60 r45
  text "B5" at 1881.81,2308.33 h60 r45
  text "D4" at 2180.72,2308.67 h60 r45
  text "C7" at 3182.91,2305.07 h60 r45
  text "B13" at 3873.9,2292.21 h60 r45
  text "D11" at 3574.81,2290.65 h60 r45
  text "C11" at 2472.67,2289.21 h60 r45
  text "D13" at 3472.93,2289.24 h60 r45
  text "A11" at 2873.31,2288.17 h60 r45
  text "A13" at 2670.46,2287.78 h60 r45
  text "B15" at 3773.58,2287.12 h60 r45
  text "D15" at 3372.43,2285.19 h60 r45
  text "A15" at 2570.27,2284.27 h60 r45
  text "E5V" at 1372.15,2281.55 h60 r45
  text "VDD" at 1464.62,2278.57 h60 r45
  text "VDD" at 3265.62,2278.57 h60 r45
  text "GND" at 2764.47,2274.39 h60 r45
  text "8" at 2668.94,2125.94 h60 r90
  text "7" at 2827.94,2126.38 h60 r90
  text "2" at 3330.14,2125.73 h60 r90
  text "4" at 3129.37,2124.61 h60 r90
  text "12" at 2269.19,2100.19 h60 r90
  text "13" at 2169.76,2099.8 h60 r90
  text "~9" at 2568.84,2094.69 h60 r90
  text "~6" at 2928.91,2094.75 h60 r90
  text "~5" at 3029.24,2094.47 h60 r90
  text "~3" at 3230.09,2094.75 h60 r90
  text "~11" at 2368.62,2072.33 h60 r90
  text "~10" at 2468.74,2065 h60 r90
  text "SCL" at 1769.22,2051.18 h60 r90
  text "USER" at 1004,2048.88 h60
  text "SDA" at 1869.82,2043.3 h60 r90
  text "GND" at 2069.69,2037.69 h60 r90
  text "TX   1" at 3430.16,2011.59 h60 r90
  text "AREF" at 1969.07,2010.46 h60 r90
  text "RX   0" at 3530.94,2008.83 h60 r90
  text "GND" at 1023,1963.88 h60
  text "DIGITAL(~=PWM)" at 2418,1947.21 h60
  text "BOOT0" at 1023,1865.88 h60
  text "IDD" at 1486,1844.9 h60
  text "VDD" at 1023,1761.9 h60
  text "BT0" at -108.96,1717.24 h60
  text "5V" at 547,1650.35 h50
  text "V" at -113.31,1620.67 h60
  text "VDD" at 514,1556.08 h50
  text "D" at -108.97,1519.82 h60
  text "VDD" at 829.5,1500.32 h60
  text "VDD" at 1122.13,1500.4 h60
  text "3V3" at 527,1458.3 h50
  text "G" at -112.46,1421.21 h60
  text "SWD" at 819.85,1400.31 h60
  text "RX" at 1122.13,1400.73 h60
  text "5V" at 3684.17,1398.22 h60
  text "MISO" at 3336,1396.88 h60
  text "C" at -110.28,1319.16 h60
  text "GND" at 826.23,1300.33 h60
  text "GND" at 1122.13,1299.71 h60
  text "MOSI" at 3684.18,1297.68 h60
  text "SCK" at 3358.99,1296.88 h60
  text "VDD" at 1655,1242.9 h60
  text "SWC" at 819.12,1200.35 h60
  text "TX" at 1122.13,1200.07 h60
  text "GND" at 3684.2,1197.16 h60
  text "NRST" at 3325.91,1196.88 h60
  text "3V3" at 1662.2,1145.39 h60
  text "NRST" at 798.92,1100.36 h60
  text "DTR" at 1122.13,1100.4 h60
  text "PB10" at 3680.53,1098.16 h60
  text "NSS" at 3363.34,1096.88 h60
  text "SWO" at 816.41,1000.38 h60
  text "RTS" at 1122.13,999.38 h60
  text "VBUS2" at 915.32,852.5 h60
  text "5V" at 1133.35,851.6 h60
  text "USB1" at 3464.22,846.18 h60
  text "VBUS" at 3654.41,846.67 h60
  text "ID" at 3996.12,837.17 h60
  text "VBUS1" at 913.8,781.33 h60
  text "5V" at 1130.81,780.94 h60
  text "GPIO" at 3461.37,746.07 h60
  text "PA9" at 3697.99,742.63 h60
  text "PA10" at 3990.51,728.78 h60
  text "PY32E407-START-ETH V2.1" at 2239.91,717.49 h80
  text "VCP" at 3482.49,645.95 h60
  text "RX" at 3723.03,636.75 h60
  text "TX" at 3985.99,631.12 h60
  text "2025-11" at 2238.26,596.78 h80
  text "PY-LINK OB V2.1" at -194.64,414.09 h80 r270
  text "NC" at 2130.22,376.44 h60 r90
  text "IOREF" at 2230.24,376.44 h60 r90
  text "RESET" at 2330.26,376.44 h60 r90
  text "3.3V" at 2429.76,376.44 h60 r90
  text "5V" at 2529.14,376.44 h60 r90
  text "GND" at 2629.17,376.44 h60 r90
  text "GND" at 2729.19,376.44 h60 r90
  text "NC" at 2829.22,376.44 h60 r90
  text "AN0" at 3028.94,376.4 h60 r90
  text "AN1" at 3129.31,376.4 h60 r90
  text "AN2" at 3229.69,376.4 h60 r90
  text "AN3" at 3330.76,376.4 h60 r90
  text "AN4" at 3430.98,376.4 h60 r90
  text "AN5" at 3531.87,376.4 h60 r90
  text "NRST" at 80.77,281.58 h60 r270
  text "SWO" at -19.22,264.09 h60 r270
  text "SWC" at 180.75,261.38 h60 r270
  text "SWD" at 380.72,260.65 h60 r270
  text "GND" at 280.73,254.27 h60 r270
  text "VDD" at 480.72,251 h60 r270
  text "E6" at 1682.55,156.96 h60 r45
  text "A3" at 2682.01,156.93 h60 r45
  text "A5" at 2781.86,156.91 h60 r45
  text "E8" at 3383.52,156.95 h60 r45
  text "E10" at 3473.05,156.98 h60 r45
  text "B10" at 3771.95,156.97 h60 r45
  text "E2" at 1503.62,156.48 h60 r45
  text "E4" at 1581.8,156.49 h60 r45
  text "F4" at 1983.93,156.5 h60 r45
  text "F2" at 2384.05,155.91 h60 r45
  text "A1" at 2483.86,156.45 h60 r45
  text "A7" at 2881.19,156.45 h60 r45
  text "B1" at 3085.29,156.48 h60 r45
  text "E12" at 3572.37,156.51 h60 r45
  text "E14" at 3671.3,156.51 h60 r45
  text "VDD" at 3845.18,156.18 h60 r45
  text "C5" at 2982.04,150.96 h60 r45
  text "C13" at 1770.6,150.52 h60 r45
  text "C0" at 2182.19,150.11 h60 r45
  text "C2" at 2282.28,150.2 h60 r45
  text "C15*" at 1864.03,149.45 h60 r45
  text "F1*" at 2076.53,149.53 h60 r45
  text "GND" at 2564.47,149.39 h60 r45
  text "VSSA" at 3154.05,141.96 h60 r45
  text "VCCA" at 3250.96,140.88 h60 r45
  text "NRST" at 946,137.88 h60
  text "1" at 1413.61,85.47 h60 r45
  text "49" at 3968.56,72.07 h60 r45
  text "2" at 1405.6,-23.54 h60 r45
  text "50" at 3977.29,-38.99 h60 r45
  text "RTS" at -20.22,-41.63 h60 r270
  text "DTR" at 80.8,-41.63 h60 r270
  text "TX" at 180.47,-41.63 h60 r270
  text "GND" at 280.12,-41.63 h60 r270
  text "RX" at 381.14,-41.63 h60 r270
  text "VDD" at 480.8,-41.63 h60 r270
  text "A2" at 2489.37,-130.77 h60 r45
  text "F3" at 1891.02,-131.55 h60 r45
  text "F5" at 2091.2,-131.65 h60 r45
  text "C1" at 2191.81,-132.13 h60 r45
  text "E3" at 1489.55,-133.81 h60 r45
  text "E5" at 1589.53,-133.91 h60 r45
  text "B0" at 2991.12,-133.93 h60 r45
  text "B2" at 3090.64,-133.73 h60 r45
  text "E7" at 3289.4,-133.7 h60 r45
  text "E9" at 3389.65,-133.86 h60 r45
  text "A0" at 2390.26,-136.78 h60 r45
  text "A4" at 2688.5,-136.63 h60 r45
  text "A6" at 2788.72,-136.86 h60 r45
  text "C3" at 2289.9,-137.37 h60 r45
  text "C4" at 2889.37,-137.26 h60 r45
  text "F0*" at 1983.81,-143.25 h60 r45
  text "E11" at 3481.19,-149.66 h60 r45
  text "B11" at 3881.75,-149.86 h60 r45
  text "E13" at 3578.88,-154.91 h60 r45
  text "E15" at 3678.98,-155.12 h60 r45
  text "VDD" at 2572.62,-165.43 h60 r45
  text "GND" at 3771.47,-166.61 h60 r45
  text "C14*" at 1770.03,-168.05 h60 r45
  text "VBAT" at 1660.5,-186.55 h60 r45
  text "VREF+" at 3150.06,-197.99 h60 r45